# Altium PCB Sound_Sensor_v3.2.PcbDoc (part 2 of 3)
Units mil, origin at the board's own origin, x right, y up, seen from the top; angles counter-clockwise.
Board outline 2755.7 x 2687.13 mil, 2 copper layers (Top Layer, Bottom Layer), stack 57 mil thick; 77 components, 57 nets, 290 pads, 84 vias.
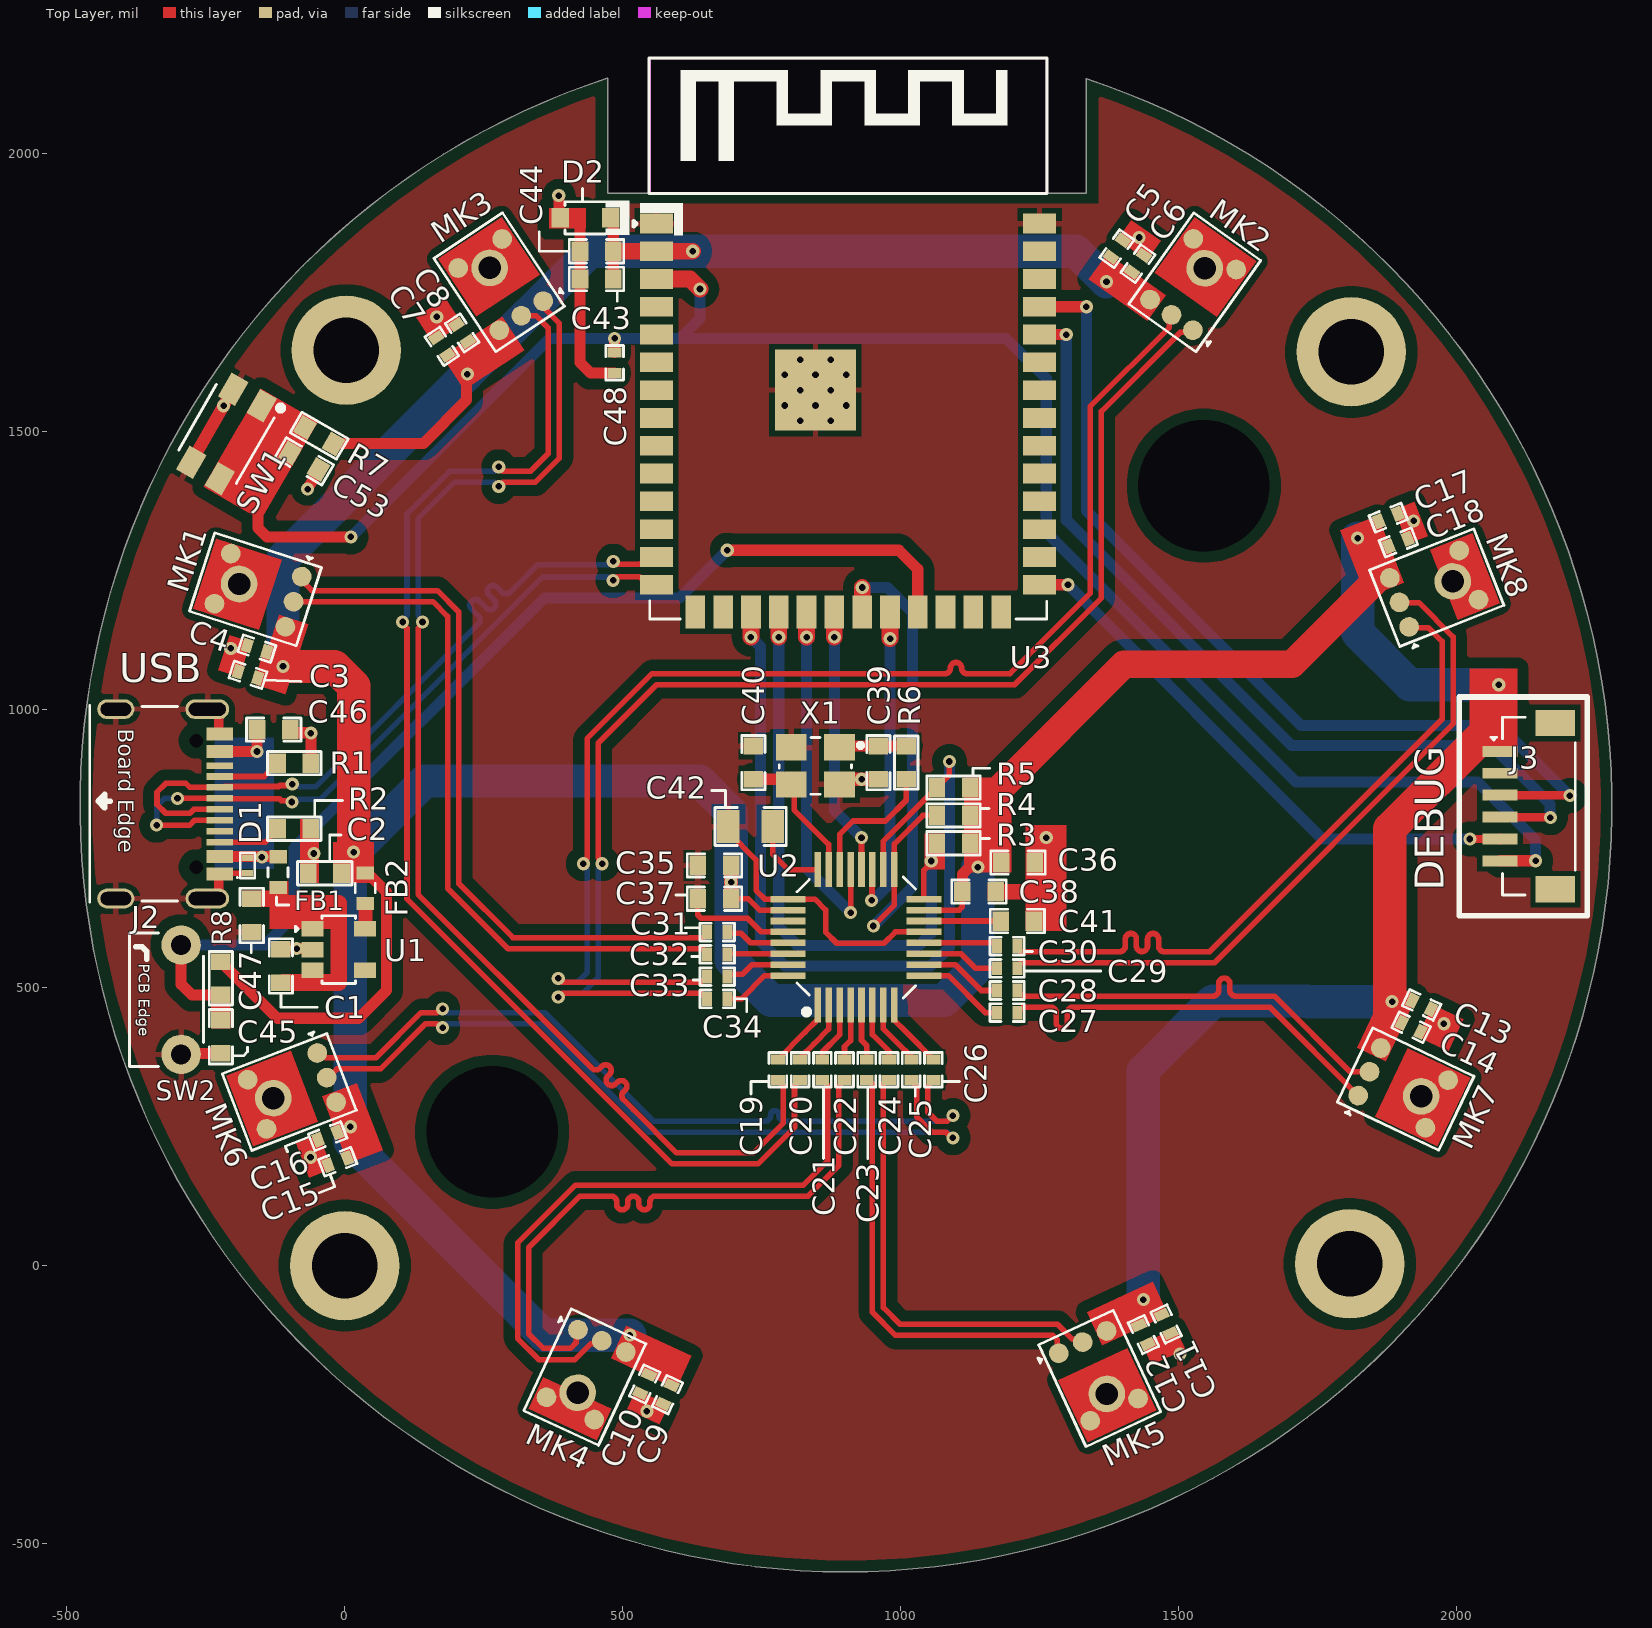
[diagram p0: Top Layer view]

## Via types
v1: diameter 23.62, hole 11.81, Top Layer to Bottom Layer, 84 vias

## Nets (pads, with @x,y where several pads share a name; then routed paths per layer and width w, separated by ;. In a path a pad name is that pad's centre, name@x,y a point inside that pad or via, vN(x,y) a via of type N, cw(c..) or ccw(c..) an arc to the next point about the centre after c; other vN are vias at no path point) (continued)
"DEBUG SIG.TX": (continued)
  Top Layer w10: J3.3@2078.28,846.46 J3.3@2078.55,846.73
  Top Layer w15: J3.3@2078.55,846.73 2079.19,846.09 2203.64,846.09 v1(2204,845.73)
  Top Layer w20: U3.37@1250,1725 v1(1334,1725)
  Bottom Layer w20: v1(1334,1725) 1334,1358 1720,972 2077.73,972 v1@2203.57,846.16